# Altium PCB Sound_Sensor_PoE_v1.0.PcbDoc (part 3 of 4)
Units mil, origin at the board's own origin, x right, y up, seen from the top; angles counter-clockwise.
Board outline 3543.31 x 3543.31 mil, 2 copper layers (Top Layer, Bottom Layer), stack 57 mil thick; 149 components, 113 nets, 536 pads, 184 vias.
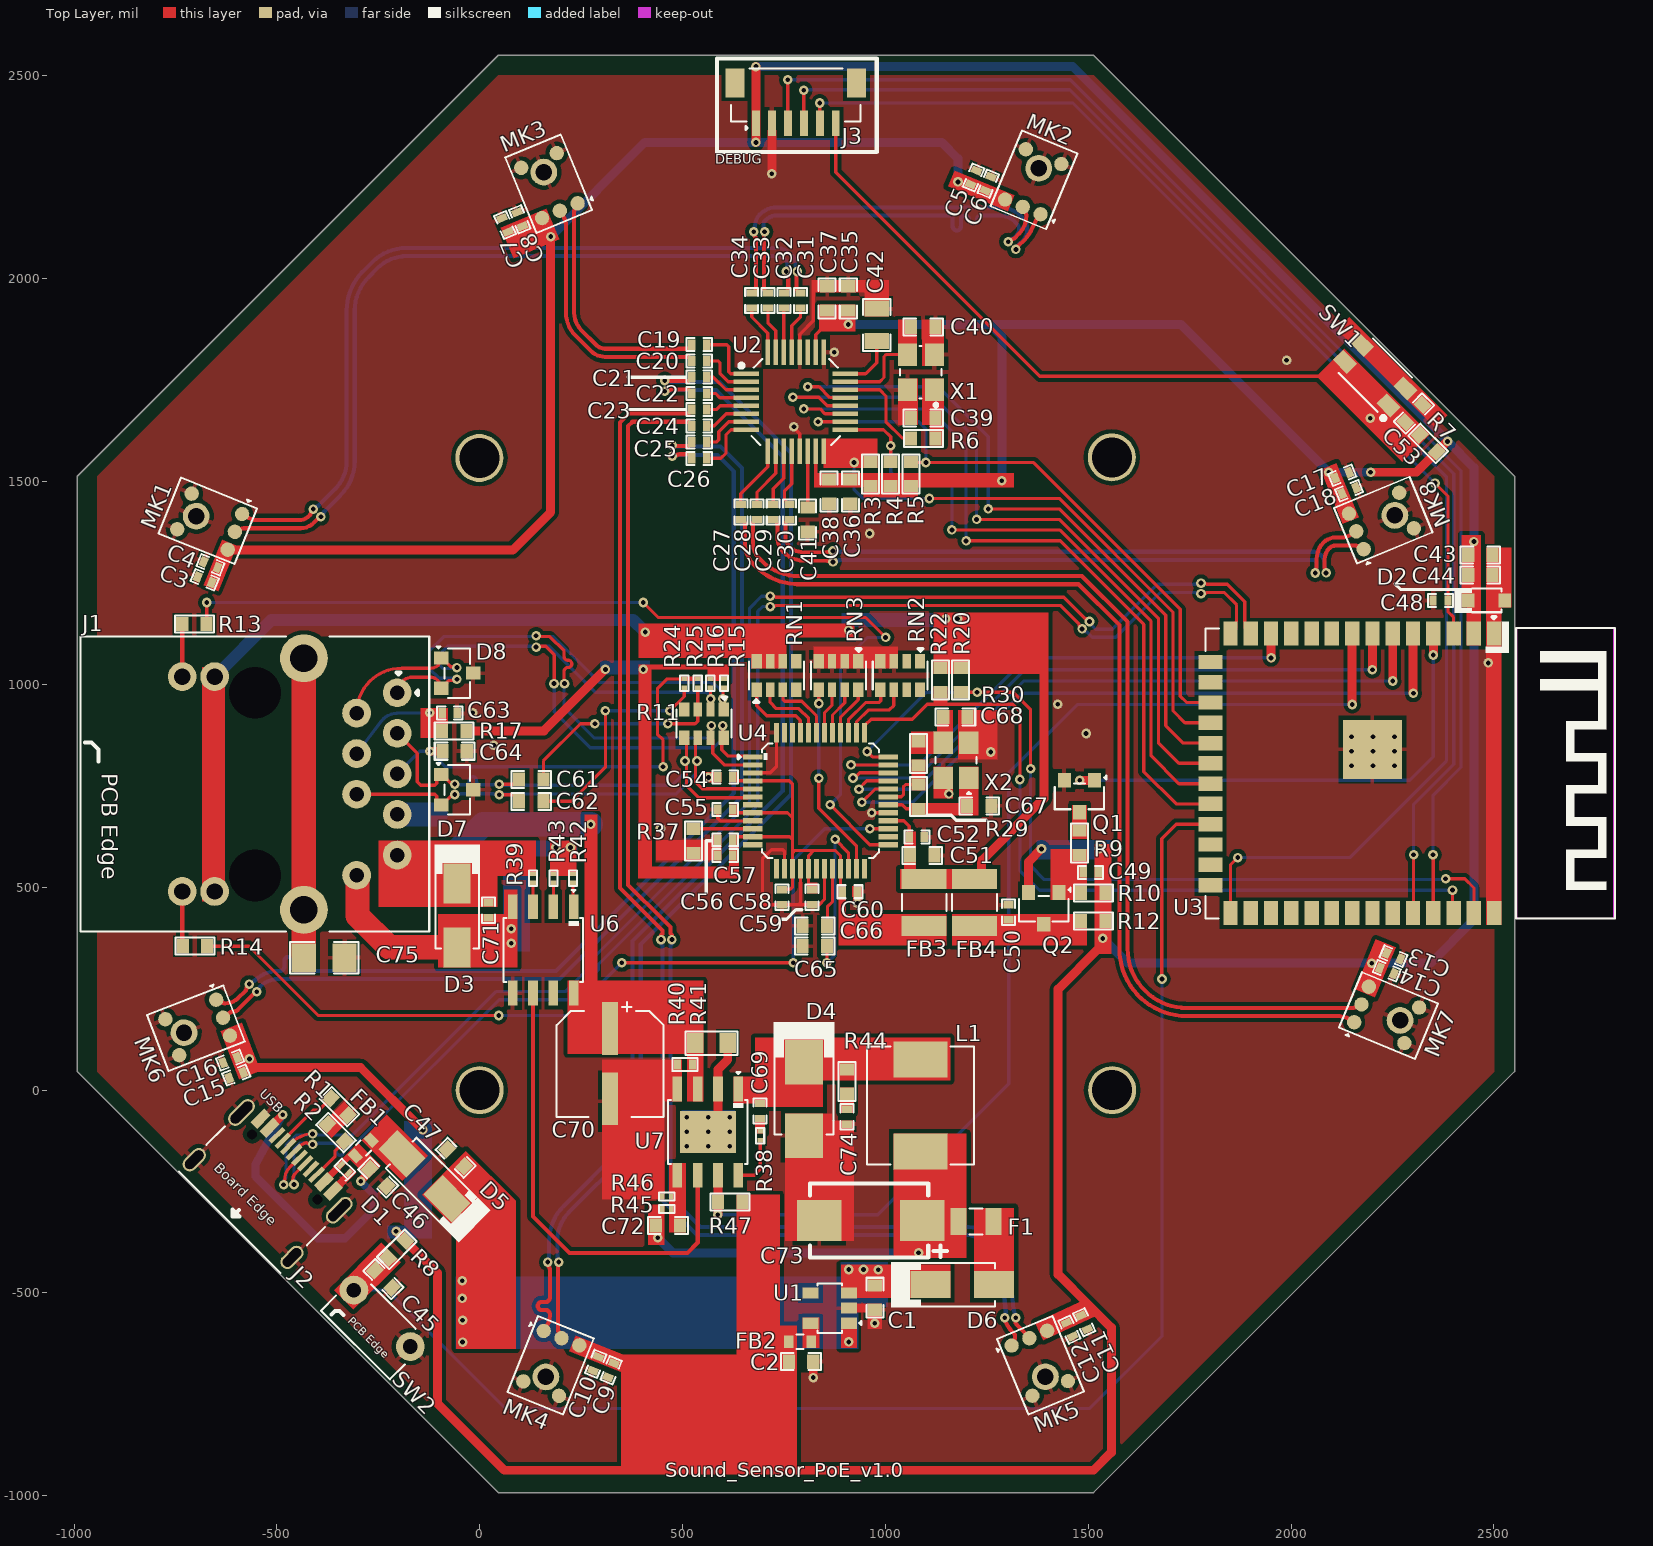
[diagram p0: Top Layer view]

## Part data (continued)
R45: library part RC0201FR-07300KL, "RES 300K OHM 1% 1/20W 0201", Case Code (Imperial)=0201, Case Code (Metric)=0603, LCSC Part Number=C274871, Manufacturer=Yageo, Max Operating Temperature=125°C, Max Power Dissipation=50mW, Min Operating Temperature=-55°C, Temperature Coefficient=200ppm/°C, Tolerance=1%, Case/Package=0201, Category="Chip SMD Resistors", ComponentLink1Description=https://datasheet.ciiva.com/26829/getdatasheetpartid-732987-26829861.pdf?src-supplier=Verical, ComponentLink1URL=https://datasheet.ciiva.com/26829/getdatasheetpartid-732987-26829861.pdf?src-supplier=Verical, Construction=Rectangular, Depth=0.3mm, Features="Moisture Resistant", Item Type=Resistor, Length=0.6mm, Manufacturer Part Number=RC0201FR-07300KL, Military Standard=Not, Number of Terminations=2, Packaging="Tape and Reel", Pricing 1="10000=0.0017, 50000=0.0016 (USD)", RoHS=Yes, RoHS Compliant=Yes, Series=RC, Stock 1=230000, Supplier 1="Arrow Electronics", Supplier Part Number 1=RC0201FR-07300KL
R46: library part RC0201DR-0757K6L, "RES 57.6K OHM 0.5% 1/20W 0201", Case/Package=0201, LCSC Part Number=C851763, Manufacturer=Yageo, Max Operating Temperature=125°C, Max Power Dissipation=50mW, Min Operating Temperature=-55°C, Supplier Part Number 1=RC0201DR-0757K6L-ND, Temperature Coefficient=200ppm/°C, Tolerance=0.5%, Category="Chip SMD Resistors", ComponentLink1Description=http://www.yageo.com.tw/exep/pages/download/literatures/PYu-R_INT-thick_7.pdf?src-supplier=Digi-Key, ComponentLink1URL=http://www.yageo.com.tw/exep/pages/download/literatures/PYu-R_INT-thick_7.pdf?src-supplier=Digi-Key, Features="Moisture Resistant", Height=0.01inch, Item Type=Resistor, Length=0.024inch, Manufacturer Part Number=RC0201DR-0757K6L, Number of Terminations=2, Packaging="Tape and Reel", Pricing 1="10000=0.02267 (USD)", RoHS=Yes, RoHS Compliant=Yes, Series=RC, Supplier 1=Digi-Key, Width=0.012inch
RN1 RN2 RN3: library part YC164-FR-0710KL, "RES ARRAY 4 RES 10K OHM 1206", Case Code (Imperial)=1206, Case Code (Metric)=3216, LCSC Part Number=C110924, Manufacturer=Yageo, Max Operating Temperature=155°C, Min Operating Temperature=-55°C, Number of Resistors=4, Power Per Element=62.5mW, Resistance Tolerance=1%, Supplier Part Number 1=5054288, Temperature Coefficient=200ppm/°C, Voltage Rating=50V, Category="Resistor Arrays", Circuit Type=Isolated, ComponentLink1Description=http://www.farnell.com/datasheets/2167431.pdf?src-supplier=Farnell, ComponentLink1URL=http://www.farnell.com/datasheets/2167431.pdf?src-supplier=Farnell, ComponentLink2Description=https://media.digikey.com/pdf/Data%20Sheets/Yageo%20PDFs/YC102-358,TC122-164_Series_DS.pdf?src-supplier=Digi-Key, ComponentLink2URL=https://media.digikey.com/pdf/Data%20Sheets/Yageo%20PDFs/YC102-358,TC122-164_Series_DS.pdf?src-supplier=Digi-Key, ComponentLink3Description=http://www.farnell.com/datasheets/2167431.pdf?src-supplier=Element14, ComponentLink3URL=http://www.farnell.com/datasheets/2167431.pdf?src-supplier=Element14, ComponentLink4Description=http://www.farnell.com/datasheets/443424.pdf?src-supplier=Element14, ComponentLink4URL=http://www.farnell.com/datasheets/443424.pdf?src-supplier=Element14, ComponentLink5Description=http://www.farnell.com/datasheets/2167431.pdf?src-supplier=Newark, ComponentLink5URL=http://www.farnell.com/datasheets/2167431.pdf?src-supplier=Newark, Height=0.028inch, Item Type="Resistor Array", Lead Free="Lead Free", Length=0.126inch, Manufacturer Part Number=YC164-FR-0710KL, Mounting Technology="Surface Mount", Number of Circuits=4, Number of Elements=4, Packaging="Tape and Reel", Pins=8, Pricing 1="5000=0.0101, 20000=0.0095, 50000=0.0092, 125000=0.0089, 200000=0.0085 (USD)", Reach SVHC Compliant=Unknown, RoHS=Yes, RoHS Compliant=Yes, Series=YC164, Stock 1=25000, Supplier 1="Future Electronics", Tolerance=1%, Width=0.063inch
SW1: "3mm 2mm Round Button 50mA Top3.65mm SPST 12V SMD Tactile Switches", Manufacturer=XKB, Package=Custom, ComponentLink1Description=LCSC, ComponentLink1URL=https://lcsc.com/product-detail/Tactile-Switches_XKB-Connectivity-TS-1185EC-C-D-B_C318893.html, Manufacturer Part No=TS-1185EC-C-D-B
SW2: "50mA Lying 100MΩ 100000 Times 250gf@±30gf 12V Plugin Tactile Switches ROHS", LCSC Part Number=C502329, Manufacturer="Korean Hroparts Elec", Package=Plugin, ComponentLink1Description=LCSC, ComponentLink1URL=https://www.lcsc.com/product-detail/Tactile-Switches_Korean-Hroparts-Elec-K2-1101DF-C4DW-01_C502329.html, Item Type="Tactile Switch", Manufacturer Part Number=K2-1101DF-C4DW-01
U1: "Linear Voltage Regulator IC Positive Fixed 1 Output 3.3V 1A SOT-25", Case/Package=SOT-25, Dropout Voltage=655mV, LCSC Part Number=C86534, Manufacturer=Torex, Max Input Voltage=6V, Max Operating Temperature=85°C, Min Current Limit=1.005A, Min Input Voltage=1.6V, Min Operating Temperature=-40°C, Nominal Output Voltage=3.3V, Output Current=1A, Package Quantity=1, Supplier Part Number 1=84R0738, Category="Voltage Regulators - Linear", ComponentLink1Description=https://datasheet.ciiva.com/7992/610888-7992813.pdf?src-supplier=Element14, ComponentLink1URL=https://datasheet.ciiva.com/7992/610888-7992813.pdf?src-supplier=Element14, ComponentLink2Description=https://datasheet.ciiva.com/5755/610888-5755886.pdf?src-supplier=Farnell, ComponentLink2URL=https://datasheet.ciiva.com/5755/610888-5755886.pdf?src-supplier=Farnell, ComponentLink3Description=https://datasheet.ciiva.com/2040/xc6220-2040201.pdf?src-supplier=Digi-Key, ComponentLink3URL=https://datasheet.ciiva.com/2040/xc6220-2040201.pdf?src-supplier=Digi-Key, ComponentLink4Description=https://datasheet.ciiva.com/2040/xc6220-2040200.pdf?src-supplier=Digi-Key, ComponentLink4URL=https://datasheet.ciiva.com/2040/xc6220-2040200.pdf?src-supplier=Digi-Key, ComponentLink5Description=https://datasheet.ciiva.com/2040/xc6220-2040202.pdf?src-supplier=Digi-Key, ComponentLink5URL=https://datasheet.ciiva.com/2040/xc6220-2040202.pdf?src-supplier=Digi-Key, Item Type=IC, Manufacturer Part Number=XC6220B331MR-G, Mount="Surface Mount", Number of Pins=5, Number of Regulators=1, Output Type=Fixed, Output Voltage=3.3V, Packaging="Tape and Reel", Pricing 1="1=1.20000, 10=1.08000, 100=0.83900, 500=0.69300, 1000=0.54800 (USD)", REACH SVHC="No SVHC", RoHS=Yes, RoHS Compliant=Yes, Series=-, Stock 1=3078, Supplier 1=Newark
U2: "IC ADC 24BIT SIGMA-DELTA 32TQFP", Manufacturer="Texas Instruments", Supplier Part Number 1=595-ADS131M08IPBSR, Category="Analog to Digital Converters (ADCs)", Manufacturer Part Number=ADS131M08IPBSR, Pricing 1="1=8.85000, 10=7.99000, 50=7.62000, 100=6.62000, 1000=5.39000, 10000=5.39000 (USD)", RoHS=Yes, Supplier 1=Mouser
U3: "SMD,18x25.5mm WiFi Modules ROHS", LCSC Part Number=C2913204, Manufacturer="Espressif Systems", Supplier Part Number 1=1965-ESP32-S3-WROOM-1-N8R2-ND, Category=Uncategorized, ComponentLink1Description=LCSC, ComponentLink1URL=https://www.lcsc.com/product-detail/WiFi-Modules_Espressif-Systems-ESP32-S3-WROOM-1-N8R2_C2913204.html, Item Type=Module, Manufacturer Part Number=ESP32-S3-WROOM-1-N8R2, RoHS=No, Supplier 1=Digi-Key
U4: "SPI LQFP-48(7x7) Ethernet ICs ROHS", LCSC Part Number=C32843, Manufacturer=WIZNET, Package=LQFP-48(7x7), ComponentLink1Description=LCSC, ComponentLink1URL=https://www.lcsc.com/product-detail/Ethernet-ICs_WIZNET-W5500_C32843.html, Item Type=IC, Manufacturer Part Number=W5500
U6: "IC POE CNTRL 1 CHANNEL 8SOIC", Case/Package=D, LCSC Part Number=C2867397, Manufacturer="Texas Instruments", Max Operating Temperature=85°C, Max Power Dissipation=12.95W, Max Supply Voltage=57V, Min Current Limit=405mA, Min Operating Temperature=-40°C, Min Supply Voltage=0V, Operating Supply Current=240uA, Output Current=450mA, Package Quantity=2500, Power Dissipation=13W, Supplier Part Number 1=595-TPS2375DR, Category="Interface ICs", ComponentLink1Description=https://datasheet.ciiva.com/1943/tps2375-1943071.pdf?src-supplier=Digi-Key, ComponentLink1URL=https://datasheet.ciiva.com/1943/tps2375-1943071.pdf?src-supplier=Digi-Key, ComponentLink2Description=https://datasheet.ciiva.com/1943/tps2375-1943070.pdf?src-supplier=Digi-Key, ComponentLink2URL=https://datasheet.ciiva.com/1943/tps2375-1943070.pdf?src-supplier=Digi-Key, ComponentLink3Description=https://datasheet.ciiva.com/1943/tps2375-1943072.pdf?src-supplier=Digi-Key, ComponentLink3URL=https://datasheet.ciiva.com/1943/tps2375-1943072.pdf?src-supplier=Digi-Key, ComponentLink4Description=https://datasheet.ciiva.com/14248/tps2375-14248055.pdf?src-supplier=Avnet, ComponentLink4URL=https://datasheet.ciiva.com/14248/tps2375-14248055.pdf?src-supplier=Avnet, Height=1.58mm, Item Type=IC, Lead Free="Lead Free", Length=5mm, Manufacturer Part Number=TPS2375DR, Number of Channels=1, Packaging="Tape and Reel", Pins=8, Pricing 1="1=2.94, 10=2.65, 50=2.5, 100=2.13, 1000=1.45, 10000=1.29 (USD)", Radiation Hardening=No, RoHS=Yes, RoHS Compliant=Yes, Series=-, Stock 1=12566, Supplier 1=Mouser, Weight=0.002561oz
U7: "Step-down type SOIC-8-EP DC-DC Converters ROHS", LCSC Part Number=C329267, Manufacturer=XDS, Package=SOIC-8-EP, ComponentLink1Description=LCSC, ComponentLink1URL=https://www.lcsc.com/product-detail/DC-DC-Converters_XDS-TX4138_C329267.html, Item Type=IC, Manufacturer Part Number=TX4138
X1: "8.192MHz SMD Crystal Resonator 12pF 150Ω ±10ppm ±30ppm -40℃~+85℃ SMD_3225_4P Crystals ROHS", Manufacturer=JYJE, Package=Custom, Manufacturer Part No=3TJ481920NYLBC
X2: library part NX3225GA-25MHZ-STD-CRG-2, "SMD3225-4P Crystals ROHS", LCSC Part Number=C438901, Manufacturer=NDK, Package=SMD3225-4P, ComponentLink1Description=LCSC, ComponentLink1URL=https://www.lcsc.com/product-detail/Crystals_NDK-NX3225GA-25MHZ-STD-CRG-2_C438901.html, Item Type=Crystal, Manufacturer Part Number=NX3225GA-25MHZ-STD-CRG-2

## Free pads (board coordinates)
  round 118.11 hole 98.43: MH(-0.78,1558.19) MH(0,0) MH(1558.19,1559.76) MH(1558.98,0)

## Via types
v1: diameter 23.62, hole 11.81, Top Layer to Bottom Layer, tented both sides, 155 vias
v2: diameter 23.62, hole 11.81, Top Layer to Bottom Layer, 29 vias

## Nets (pads, with @x,y where several pads share a name; then routed paths per layer and width w, separated by ;. In a path a pad name is that pad's centre, name@x,y a point inside that pad or via, vN(x,y) a via of type N, cw(c..) or ccw(c..) an arc to the next point about the centre after c; other vN are vias at no path point)
3V3: C2.1 C3.1 C4.1 C5.1 C6.1 C7.1 C8.1 C9.1 C10.1 C11.1 C12.1 C13.1 C14.1 C15.1 C16.1 C17.1 C18.1 C35.1 C36.1 C37.1 C38.1 C43.1 C44.1 C49.2 D2.1 FB2.2 J3.1 MK1.5 MK2.5 MK3.5 MK4.5 MK5.5 MK6.5 MK7.5 MK8.5 Q2.2 R3.2 R4.2 R5.2 R7.1 R8.2 R10.2 R12.2 R47.2 U2.15 U2.26 U3.2 | length 13795.7
  Top Layer w8: U2.15@828.35,1574.76 828.35,1510.17 833.04,1505.49 C38.1@861.59,1505.49 C36.1@913.59,1505.49 ; U2.26@828.35,1818.85 828.35,1862.35 848.59,1882.59 C37.1@848.59,1921.49 ; v1(1536,374) 1536.49,374.49 1536.49,417 R10.2@1536.49,481.74
  Top Layer w22: MK1.5@-621.18,1332.26 -621.18,1331 81,1331 175,1425 v1(175,2104) ; v1@-567.66,75.92 v1(-567.66,76.91) ; -559.31,55.81 -293.81,55.81 v2(-140,-98) ; v1(-206.06,-348) -206.06,-348.05 R8.2@-183.09,-371.09 R8.2@-183.09,-371.09 -104.1,-450.07 -104.1,-771.9 61,-937 1513,-937 1557,-893 1557,-585.22 1501.41,-529.64 1426,-454.22 1426,248.99 1526.5,349.49 1526.5,367.49 1533.01,374 v1(1536,374) ; v1@680.85,2335.6 v1(680.85,2336.15) J3.1@680.85,2382.99 v1(680.85,2523) ; v1(680.85,2336.15) J3.1@680.88,2362.5 ; Q2.2@1353.09,487.36 1353.09,562.87 v1(1384.82,594.6) ; v1(2196.16,1523) 2309.17,1523 R7.1@2359.22,1573.05 2359.64,1573.05 2385.58,1599 v1(2386,1599)
  Bottom Layer w22: v1(175,2104) 407.15,2336.15 v1(680.85,2336.15) 1138.85,2336.15 1179,2296 v1(1179,2238.8) ; v1@682,2523 682.22,2523.22 1461.78,2523.22 v1(2386,1599) 2450.7,1534.3 2450.7,1175.08 2450.7,419.7 2344,313 v1(2199,313) 1597,313 v1(1536,374) ; v1(908.59,1887.59) 1257.14,1887.59 ; v2(1287,1502) 1287,1857.73 1257.14,1887.59 ; v1(2196.16,1523) v1(2093,1523) 1728.41,1887.59 1257.14,1887.59
  other v1: 1527.49,594.6 2450.79,1352.09
5V: C1.1 C47.1 D5.1 D6.1 U1.1 U1.3 | length 0.7
  Top Layer w22: v1@982.02,-446.05 v1@982.49,-446.51
  other v1: -42,-621 909.86,-620.51 -42,-567 -43,-513.31 -43,-470 982.49,-442.51 909.86,-442.05 946.17,-442.05
5V_USB: D5.2 FB1.2
\C\S\: R4.1 U2.17 U3.21 | length 1610.3
  Top Layer w8: U2.17@901.19,1627.91 995.37,1627.91 1013,1610.28 R4.1@1013,1549 ; v1(1164,1381) 1429.46,1381 1655,1155.46 1655,824 1723.51,755.49 U3.21@1801.49,755.49
  Bottom Layer w8: v1(1013,1588.49) 1013,1523 1023,1513 1141,1513 1164,1490 v1(1164,1381)
\D\R\D\Y\: R5.1 U2.18 U3.17 | length 1532.8
  Top Layer w8: v1(834.26,1647.59) U2.18@901.19,1647.59 ; R5.1@1063,1549 1065,1547 v1(1100,1547) 1365.28,1547 1727,1185.28 1727,971 1742.51,955.49 U3.17@1801.49,955.49
  Bottom Layer w8: v1(834.26,1647.59) 1082.41,1647.59 1100,1630 v1(1100,1547)
\R\E\S\E\T\: R3.1 U2.16 U3.18 | length 1468
  Top Layer w8: U2.16@848.04,1574.76 848.04,1549.17 849.94,1547.26 922.74,1547.26 v1(923,1547) 961,1547 R3.1@963,1549 ; v1(1108.59,1458.43) 1428.39,1458.43 1709,1177.82 1709,935 1738.51,905.49 U3.18@1801.49,905.49
  Bottom Layer w8: v1(923,1547) 923,1480 944.57,1458.43 v1(1108.59,1458.43)

## Text inside footprints (layer, text, board x,y; h text height)
J1: Top Overlay "PCB Edge" at -931.01,781.49 h40 r270
J2: Top Overlay "Board Edge" at -656.85,-194.12 h25 r315
SW2: Top Overlay "PCB Edge" at -325.99,-571.23 h20 r315